# Altium PCB WifiScan_PCB.PcbDoc
Units mm, origin at the board's own origin, x right, y up, seen from the top; angles counter-clockwise.
Board outline 45.47 x 52.64 mm, 2 copper layers (Top Layer, Bottom Layer), stack 1.501 mm thick; 4 components, 4 nets, 40 pads, 0 vias.
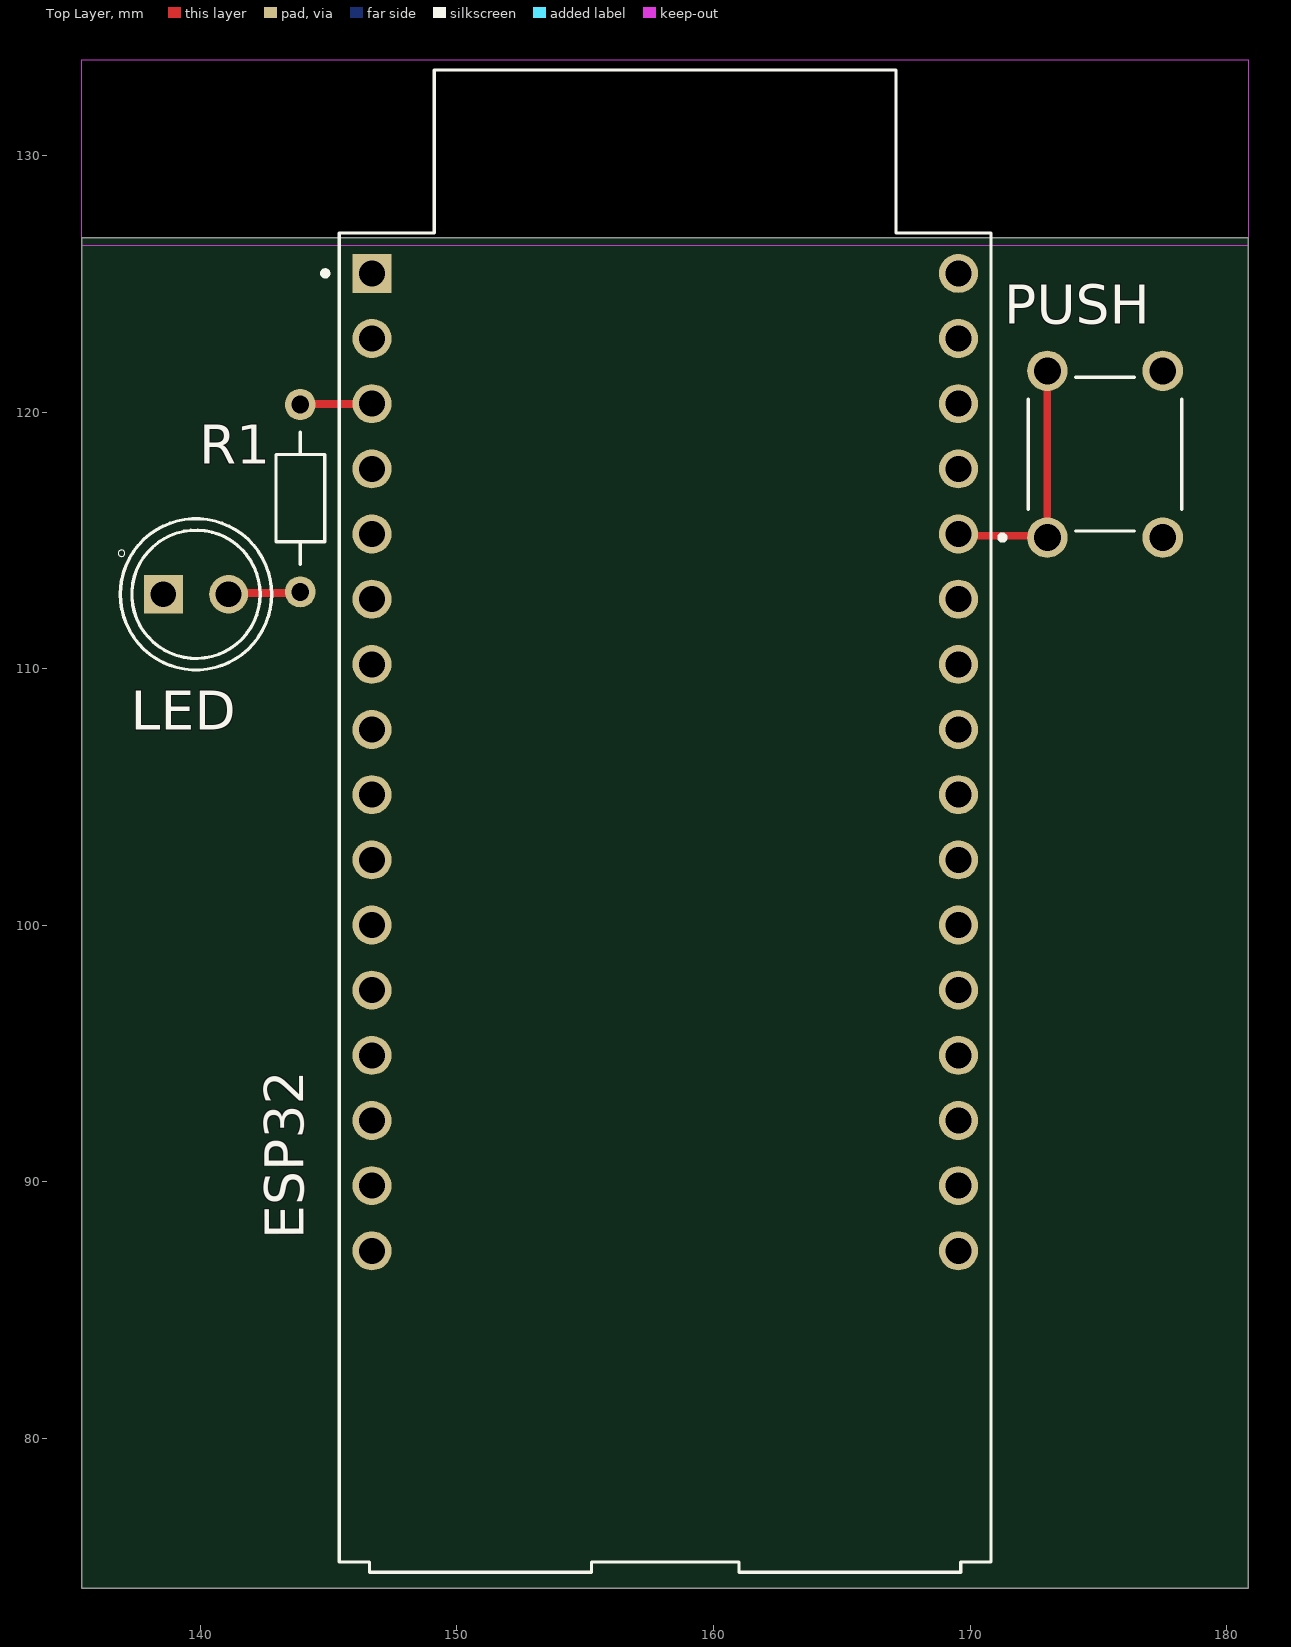
[diagram p0: Top Layer view]
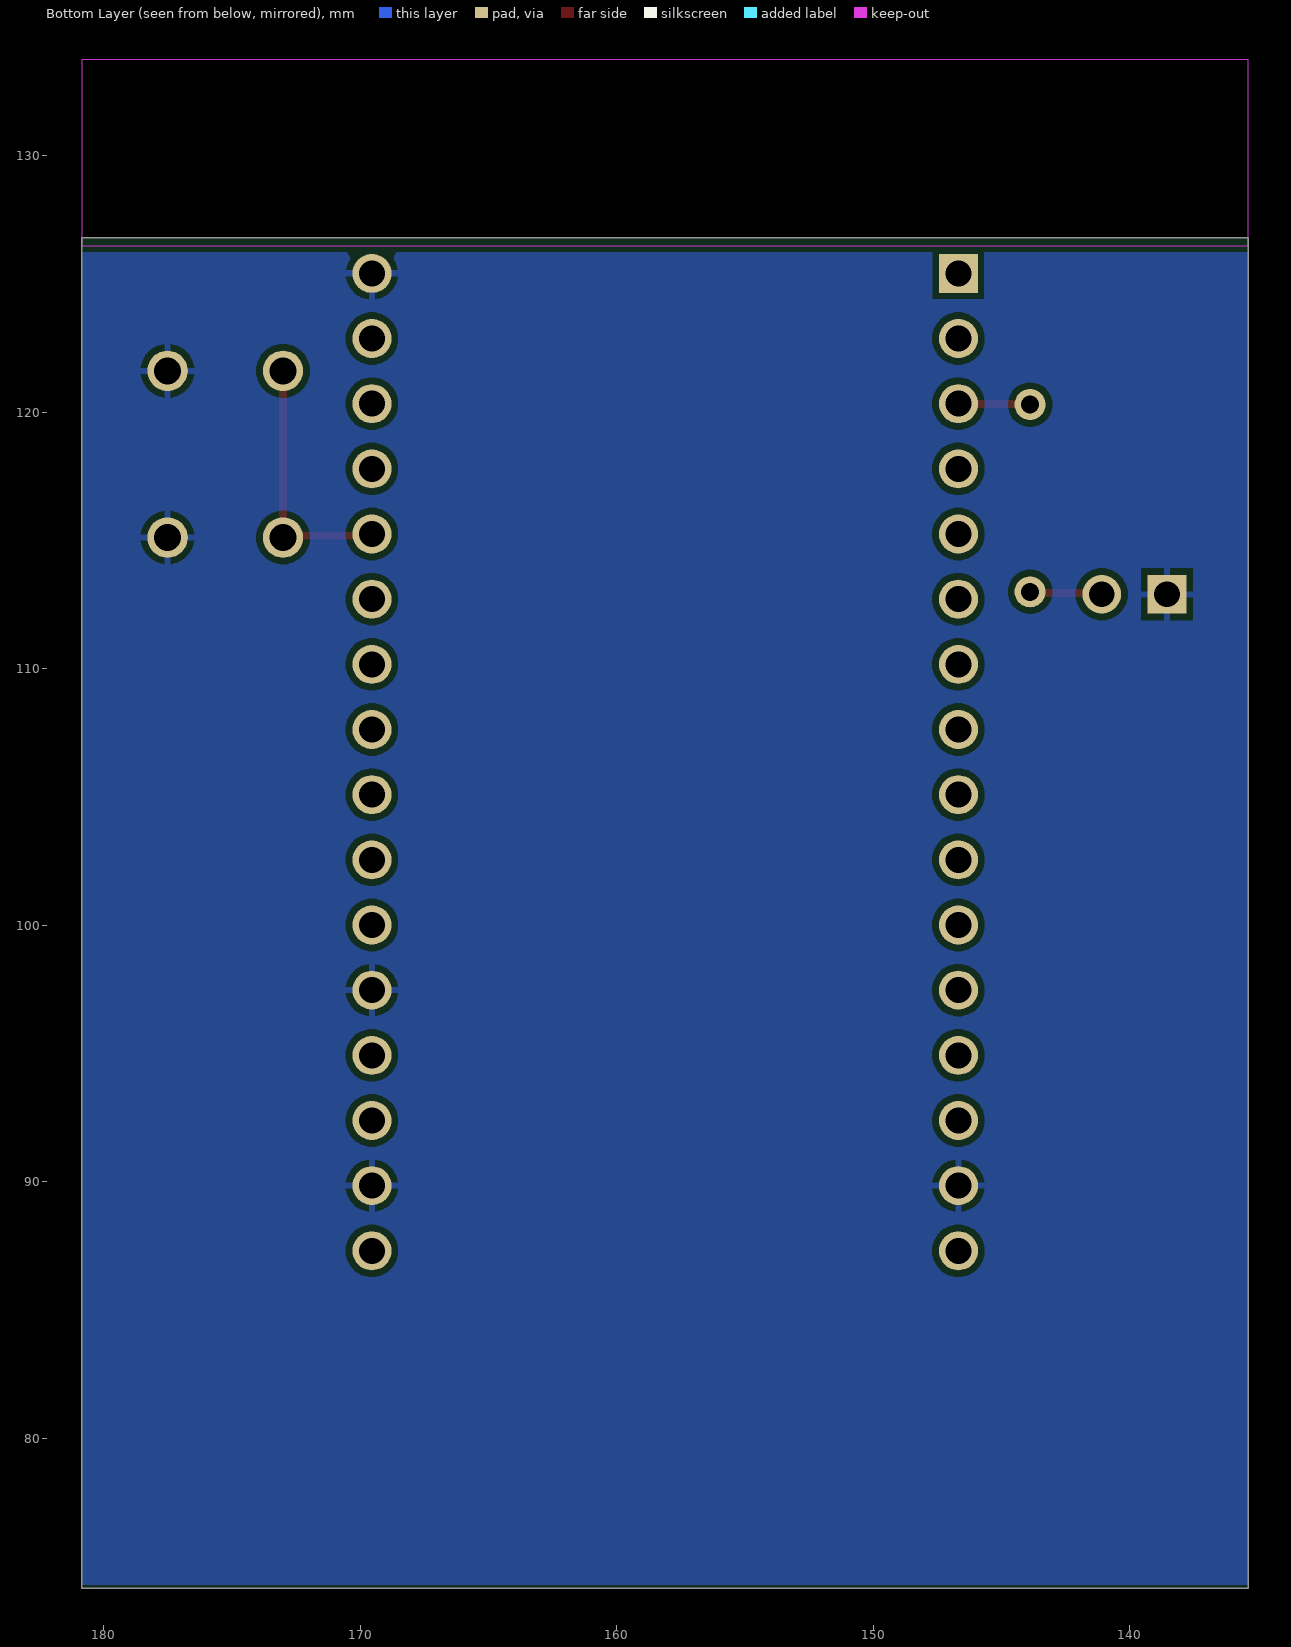
[diagram p1: Bottom Layer view, seen from below]
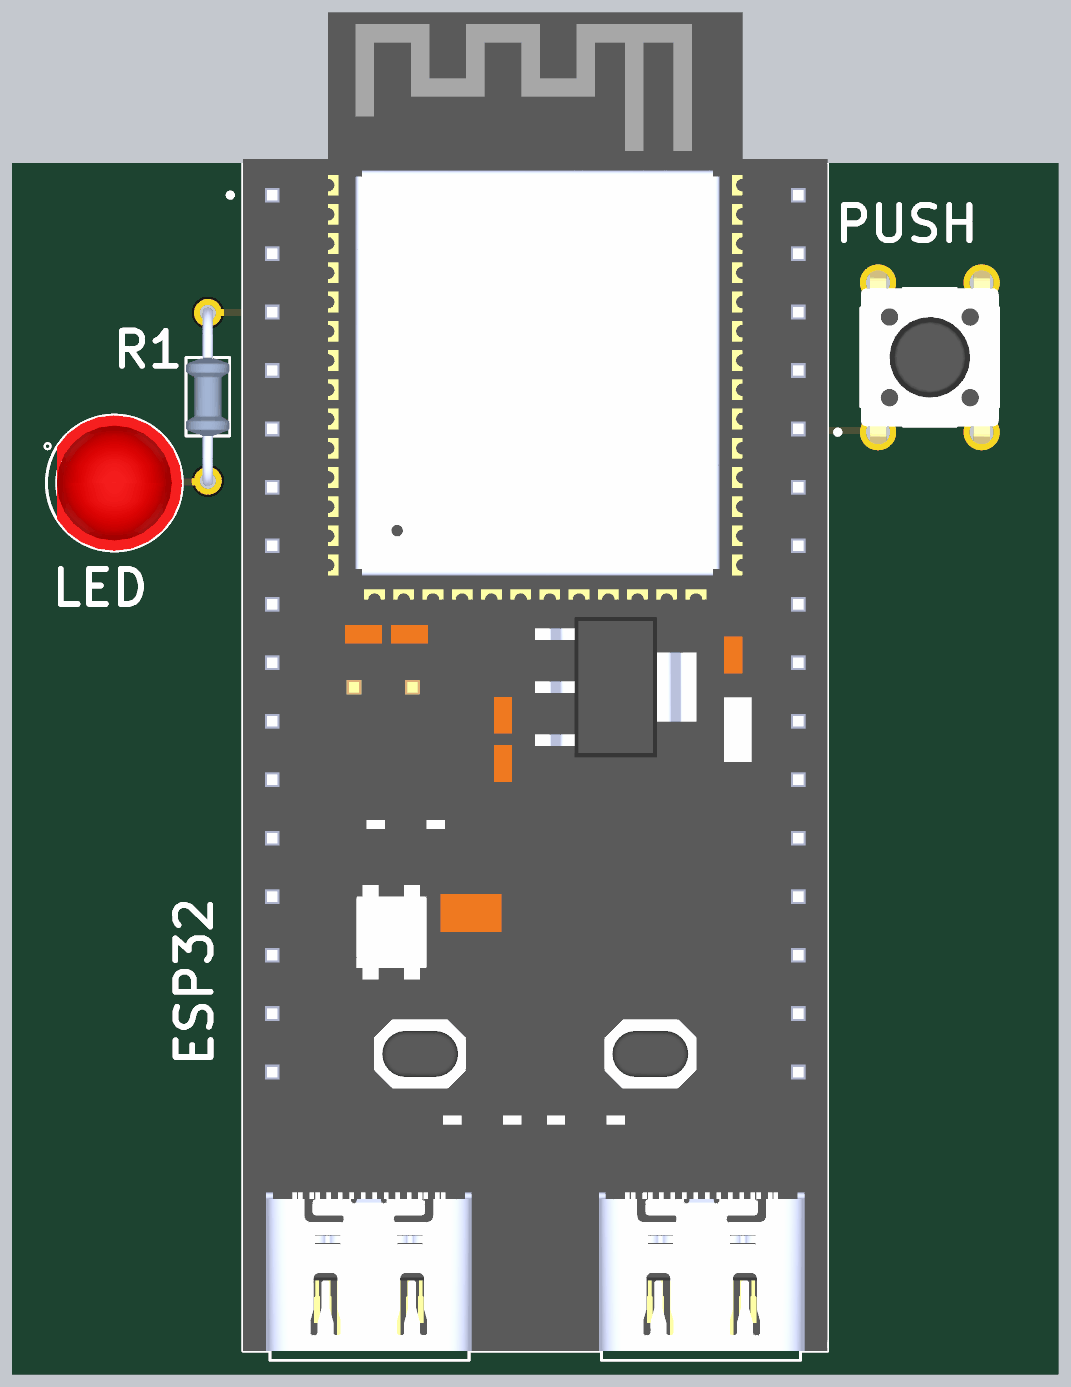
[diagram p2: 3D render of the assembled board from above, using the file's embedded part models]

## Layer stack, top to bottom
Top Solder: solder mask 0.0102, Solder Resist, Dk 3.5
Top Layer: signal copper 0.0356
Dielectric 1: dielectric 1.43, FR-4, Dk 4.8
Bottom Layer: signal copper 0.0356
Bottom Solder: solder mask 0.0102, Solder Resist, Dk 3.5

## Board outline
135.382,74.168 180.848,74.168 180.848,126.809 135.382,126.809

## Design rules (kind name [scope] priority, off if disabled: settings)
Clearance [All] p1: gap=0.2 ignorepadtopadclearanceinfootprint=FALSE
HoleSize [All] p1: absolutevalues=TRUE maxlimit=2.54 minlimit=0.2 maxpercent=80.000 minpercent=20.000
HoleToHoleClearance [All] p1: gap=0.5 allowstackedmicrovias=TRUE
MinimumAnnularRing [All] p1: minimumring=0.2
PolygonConnect [All] p1: connectstyle=Relief reliefconductorwidth=0.254 reliefentries=4 polygonreliefangle="90 Angle" airgapwidth=0.254
RoutingVias [All] p1: holewidth=0.711 width=1.27 viastyle="Through Hole" minholewidth=0.711 minwidth=1.27 maxholewidth=0.711 maxwidth=1.27
SilkToSolderMaskClearance [IsPad] p1: minsilkscreentomaskgap=0.015 clearancetoexposedcopper=TRUE
SolderMaskExpansion [All] p1: expansion=0 istentingtop=FALSE
SupplyNets "Schematic Supply Nets" [InNet('GND')] p1: voltage=0.000
Width [All] p1: maxlimit=0.356 minlimit=0.2 preferedwidth=0.305 minimp=50.000000 maximp=50.000000 favimp=50.000000
27 further rules are at their usual default settings.

## Components (designator, comment, footprint, x,y, rotation, side; value= is the part's Value field where it differs from the comment)
ESP32 "ESP32-C6-DEVKITC-1-N8" MODULE_ESP32-C6-DEVKITC-1-N8 158.115,101.087 r0 top
LED "WP7113ID" LED_WP7113ID 139.827,112.903 r0 top
PUSH "FSM8JH" SW_FSM8JH 175.26,118.364 r180 top
R1 "330Ω" RESAD730W45L370D210 143.891,116.649 r90 top

## Footprints (in the part's own frame and the unit in brackets; to place one, negate y for a bottom-side part, rotate by r counter-clockwise, add the part's x,y. Pads: shape width x height; smd on the part's side, far side on the other; paste and mask are expansions set on the pad)
LED_WP7113ID [mm]
  round 1.508 hole 1: A(1.27,0)
  rect 1.508x1.508 / inner round 1.508 / far side rect 1.508x1.508 hole 1: C(-1.27,0)
  silkscreen extent -3.03,-2.95 2.95,2.95, body extent -2.5,-2.95 2.95,2.95, height 9.6
MODULE_ESP32-C6-DEVKITC-1-N8 [mil]
  rect 60x60 / inner round 60 / far side rect 60x60 hole 40: J1_1(-450,957.68)
  round 60 hole 40: J1_2(-450,857.68) J1_3(-450,757.68) J1_4(-450,657.68) J1_5(-450,557.68) J1_6(-450,457.68) J1_7(-450,357.68) J1_8(-450,257.68) J1_9(-450,157.68) J1_10(-450,57.68) J1_11(-450,-42.32) J1_12(-450,-142.32) J1_13(-450,-242.32) J1_14(-450,-342.32) J1_15(-450,-442.32) J1_16(-450,-542.32) J3_1(450,957.68) J3_2(450,857.68) J3_3(450,757.68) J3_4(450,657.68) J3_5(450,557.68) J3_6(450,457.68) J3_7(450,357.68) J3_8(450,257.68) J3_9(450,157.68) J3_10(450,57.68) J3_11(450,-42.32) J3_12(450,-142.32) J3_13(450,-242.32) J3_14(450,-342.32) J3_15(450,-442.32) J3_16(450,-542.32)
  silkscreen extent -526,-1035 500,1270, body extent -500,-1020 500,1270, height 513
RESAD730W45L370D210 [mm]
  round 1.208 hole 0.7 mask+0.102: 1(-3.65,0) 2(3.65,0)
  silkscreen extent -2.58,-0.95 2.58,0.95, body extent -3.88,-0.95 3.88,0.95, height 1.9
SW_FSM8JH [mm]
  round 1.575 hole 1.05: 1(2.25,3.25) 2(2.25,-3.25) 3(-2.25,3.25) 4(-2.25,-3.25)
  silkscreen extent -3,-3 4.1,3.35, body extent -3,-3.95 3,3.95, height 9.5

## Part data
ESP32: "The ESP32-C6-DEVKITC-1-N8 from Espressif Systems is a development board designed for RF, RFID, and wireless applications. Built around the ESP32-C6-WROOM-1 module, it supports multiple connectivity options including 802.11 b/g/n/ax Wi-Fi, BluetoothÂ® (BLE", Package=None, Check_prices=https://www.snapeda.com/parts/ESP32-C6-DEVKITC-1-N8/Espressif+Systems/view-part/?ref=eda, MF="Espressif Systems", MP=ESP32-C6-DEVKITC-1-N8, SnapEDA_Link=https://www.snapeda.com/parts/ESP32-C6-DEVKITC-1-N8/Espressif+Systems/view-part/?ref=snap
LED: "Red 617nm LED Indication - Discrete 2V Radial", Package="Radial Kingbright", Availability="In Stock", Check_prices=https://www.snapeda.com/parts/WP7113ID/Kingbright/view-part/?ref=eda, MF=Kingbright, MP=WP7113ID, Price=None, Purchase-URL=https://pricing.snapeda.com/search/part/WP7113ID/?ref=eda, SnapEDA_Link=https://www.snapeda.com/parts/WP7113ID/Kingbright/view-part/?ref=snap
PUSH: "Switch,Pushbutton,Tactile,SPST,Thru Hole,Vertical,6MM,Black", Package=None, Check_prices=https://www.snapeda.com/parts/FSM8JH/TE+Connectivity+ALCOSWITCH+Switches/view-part/?ref=eda, MF="TE Connectivity", MP=FSM8JH, SnapEDA_Link=https://www.snapeda.com/parts/FSM8JH/TE+Connectivity+ALCOSWITCH+Switches/view-part/?ref=snap
R1: library part MFR-12FRF52-330R, "MFR Series, Watts 1/6 Â±1% Tolerance, Â±100 ppm/C TCR, Resistance 330R Tape/Reel", Package="RADIAL-2 Yageo", Check_prices=https://www.snapeda.com/parts/MFR-12FRF52-330R/Yageo/view-part/?ref=eda, MF=YAGEO, MP=MFR-12FRF52-330R, SnapEDA_Link=https://www.snapeda.com/parts/MFR-12FRF52-330R/Yageo/view-part/?ref=snap

## Nets (pads, with @x,y where several pads share a name; then routed paths per layer and width w, separated by ;. In a path a pad name is that pad's centre, name@x,y a point inside that pad or via, vN(x,y) a via of type N, cw(c..) or ccw(c..) an arc to the next point about the centre after c; other vN are vias at no path point)
GND: ESP32.J1_15 ESP32.J3_1 ESP32.J3_12 ESP32.J3_15 LED.C PUSH.3 PUSH.4
NetESP32_J1_3: ESP32.J1_3 R1.2 | length 2.8
  Top Layer w0.254: R1.2 R1.2@143.907,120.316 ; ESP32.J1_3@146.669,120.316 ESP32.J1_3
  Top Layer w0.305: R1.2@143.907,120.316 ESP32.J1_3@146.669,120.316
NetESP32_J3_5: ESP32.J3_5 PUSH.1 PUSH.2 | length 10
  Top Layer w0.305: ESP32.J3_5 169.614,115.183 172.941,115.183 PUSH.1 PUSH.2
NetLED_A: LED.A R1.1 | length 2.8
  Top Layer w0.254: LED.A LED.A@141.145,112.951 ; R1.1@143.843,112.951 R1.1
  Top Layer w0.305: LED.A@141.145,112.951 R1.1@143.843,112.951
pads on no net: ESP32.J1_1 ESP32.J1_2 ESP32.J1_4 ESP32.J1_5 ESP32.J1_6 ESP32.J1_7 ESP32.J1_8 ESP32.J1_9 ESP32.J1_10 ESP32.J1_11 ESP32.J1_12 ESP32.J1_13 ESP32.J1_14 ESP32.J1_16 ESP32.J3_2 ESP32.J3_3 ESP32.J3_4 ESP32.J3_6 ESP32.J3_7 ESP32.J3_8 ESP32.J3_9 ESP32.J3_10 ESP32.J3_11 ESP32.J3_13 ESP32.J3_14 ESP32.J3_16

## Polygon pours and split planes (outlines as drawn)
GND on Bottom Layer "GND_L02_P000" (solid, pour order 0): 135.382,126.873 180.848,126.873 180.848,74.295 135.382,74.295

## Keep-outs
Top Layer:
  region: 180.848,126.492 135.382,126.492 135.382,133.731 180.848,133.731
Bottom Layer:
  region: 180.848,126.492 135.382,126.492 135.382,133.731 180.848,133.731